# Altium PCB Stepper-Driver-v2.0.PcbDoc (part 5 of 7)
Units mil, origin at the board's own origin, x right, y up, seen from the top; angles counter-clockwise.
Board outline 5905.51 x 4330.71 mil, 4 copper layers (Top Layer, Layer 1, Layer 2, Bottom Layer), stack 62.047 mil thick; 312 components, 285 nets, 1093 pads, 969 vias.
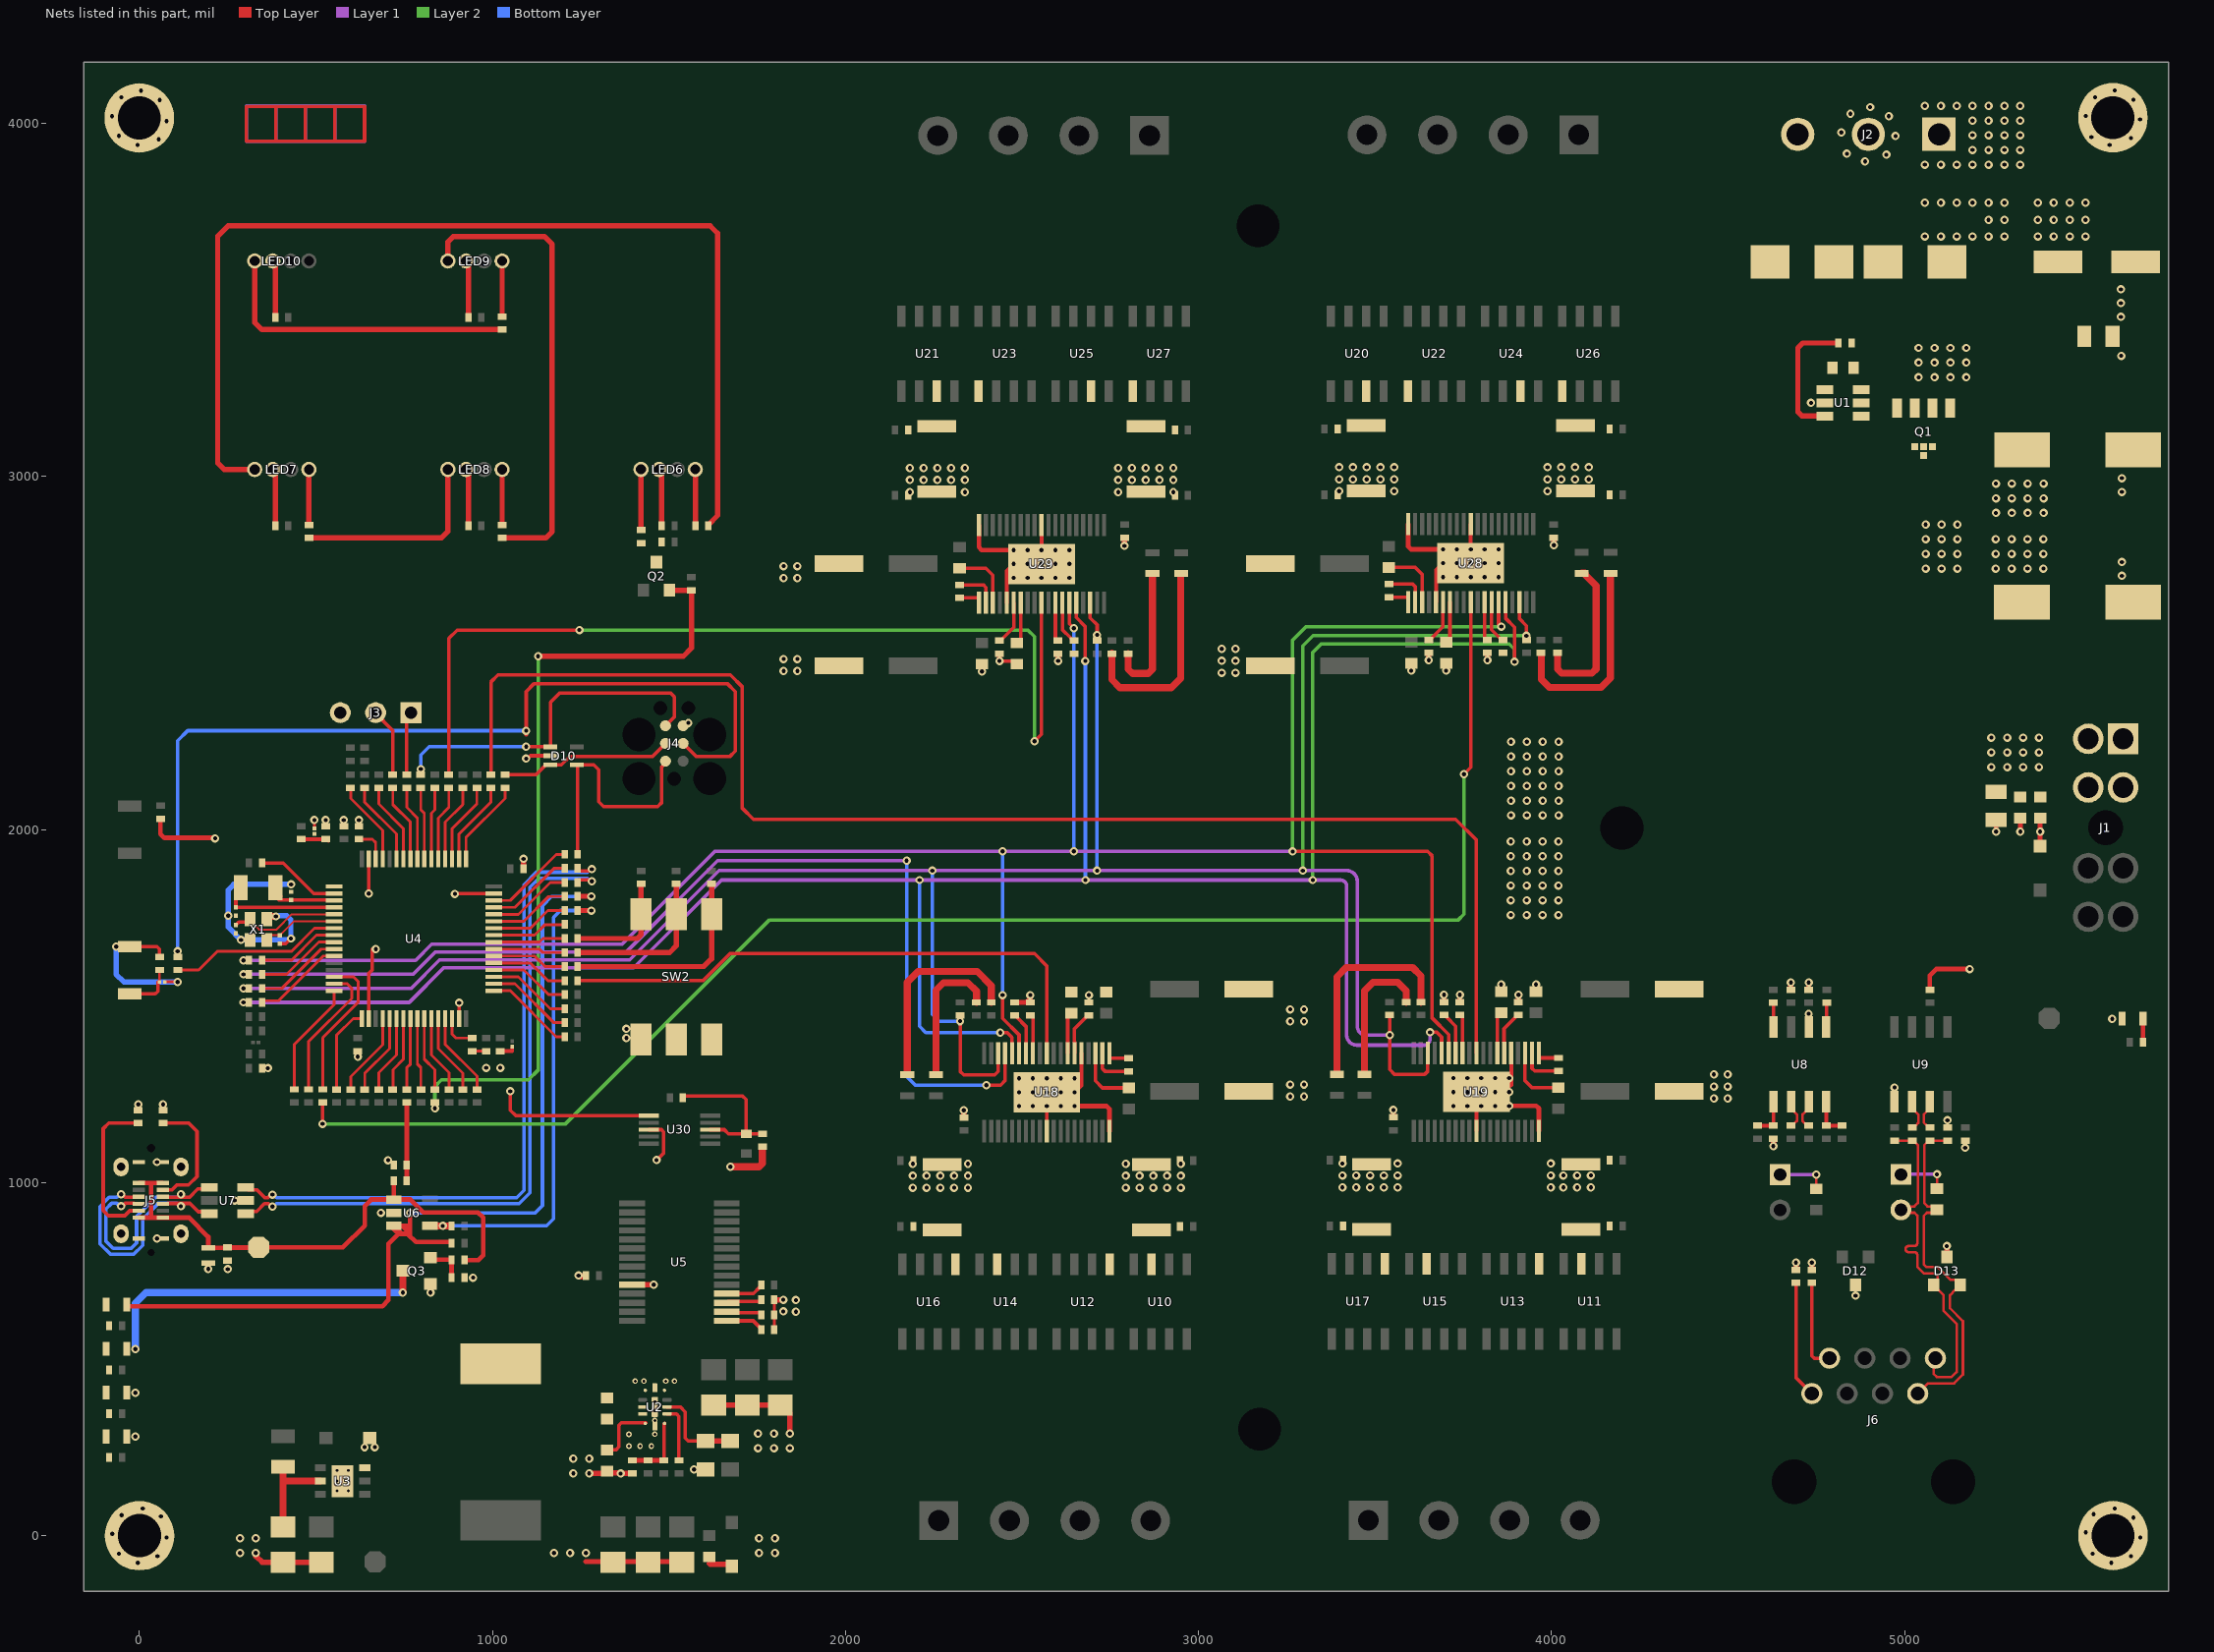
[diagram p5: the nets of this part, all layers, seen from the top]

## Via types
v1: diameter 23.62, hole 11.81, Top Layer to Bottom Layer, tented both sides, 945 vias
v2: diameter 15.75, hole 7.87, Top Layer to Bottom Layer, 24 vias

## Nets (pads, with @x,y where several pads share a name; then routed paths per layer and width w, separated by ;. In a path a pad name is that pad's centre, name@x,y a point inside that pad or via, vN(x,y) a via of type N, cw(c..) or ccw(c..) an arc to the next point about the centre after c; other vN are vias at no path point) (continued)
GND: C1.2 C2.2 C3.2 C4.1 C5.1 C6.1 C7.1 C10.1 C11.1 C12.1 C13.1 C14.1 C15.1 C16.1 C18.1 C19.1 C20.1 C21.2 C22.2 C23.1 C24.1 C25.1 C26.1 C27.1 C28.1 C31.1 C32.1 C33.1 C34.1 C35.1 C36.2 C37.2 C38.1 C39.1 C40.1 C41.1 C42.1 C43.1 C44.1 C45.1 C48.2 C49.2 C50.2 C51.2 C53.1 C55.1 C56.2 C57.1 C58.2 C59.1 C60.2 C61.2 C64.2 C65.2 C66.2 C67.2 C69.1 C71.1 C72.2 C73.1 C74.2 C75.1 C76.2 C77.2 C78.2 D2.1 D3.2 D4.1 D5.1 D6.1 D7.1 D9.1 D10.2 D11.2 D12.3 D13.3 J2.2 J3.3 J4.5 J5.A1 J5.A12 J5.B1 J5.B12 LED1.2 LED2.2 LED3.2 LED6.3 LED7.3 LED8.3 LED9.3 LED10.3 NT3.2 NT4.2 NT7.2 NT8.2 NT11.2 NT12.2 NT15.2 NT16.2 Q3.1 R6.1 R7.1 R12.1 R63.2 R66.2 R67.2 R69.1 R78.1 R79.1 R80.2 R81.2 R87.1 R88.1 R93.1 R97.2 R101.1 R102.1 R103.1 R104.1 R105.1 R106.1 R113.1 R114.1 R115.1 R116.1 R117.1 R118.1 R119.1 R120.1 R127.1 R128.1 R131.2 SW1.2 SW2.4 SW2.5 SW2.6 U1.2 U2.1 U2.6 U2.11 U2.13 U3.6 U3.7 U4.18 U4.31 U4.47 U4.63 U5.10 U6.2 U7.2 U8.2 U9.5 U18.5 U18.29 U18.38 U18.39 U19.5 U19.29 U19.38 U19.39 U28.5 U28.29 U28.38 U28.39 U29.5 U29.29 U29.38 U29.39 U30.1 U30.3 X1.2 X1.4 | length 9322.6
  Top Layer w7: U9.5@4971.25,1228.84 v1(4971.25,1269.46)
  Top Layer w8: SW1.2@-45.71,1668.54 SW1.2@-45.67,1668.5 ; D9.1@73.74,1568.55 v1(108.23,1568.55) ; D7.1@495.25,2005.43 v1(495.22,2027.16) ; C21.2@942.12,1372.66 C25.1@981.93,1372.66 ; C36.2@1264.29,736.72 C36.2@1264.33,736.68 ; R67.2@1797.83,668.18 1797.87,668.13 R67.2@1797.83,668.18 R66.2@1797.83,625.81 R63.2@1797.83,583.45 R63.2@1797.87,583.41 ; C60.2@2334.88,1184.41 C60.2@2334.88,1184.41 ; C71.1@2386.16,2468.6 C71.1@2386.2,2468.64 ; C74.2@2435.79,2498.14 C74.2@2435.84,2498.18 ; R103.1@2523.01,1510.54 R103.1@2523.05,1510.59 ; R118.1@2601.89,2498.14 R118.1@2601.93,2498.19 ; C56.2@2689.06,1510.51 C56.2@2689.1,1510.55 ; C77.2@2789.97,2824.23 C77.2@2790.01,2824.27 ; C61.2@3551.72,1185.27 C61.2@3551.76,1185.31 ; C69.1@3602.14,2470.74 C69.1@3602.19,2470.78 ; C72.2@3651.78,2500.28 C72.2@3651.78,2500.28 ; C73.1@3700.96,2470.78 C73.1@3701.01,2470.82 ; R117.1@3817.87,2500.28 R117.1@3817.87,2500.28 ; C59.1@3856.71,1540.87 C59.1@3856.75,1540.91 ; C58.2@3905.9,1511.36 C58.2@3905.94,1511.41 ; C55.1@3955.53,1540.9 C55.1@3955.57,1540.94 ; C76.2@4005.95,2826.37 C76.2@4006,2826.42 ; R93.1@4627.95,1124.23 R93.1@4627.99,1124.28 ; C38.1@4677.45,1546.23 C38.1@4677.45,1546.23 ; R88.1@4691.95,753.25 R88.1@4691.95,753.25 ; C39.1@4727.95,1546.23 C39.1@4727.95,1546.23 ; R87.1@4736.95,753.25 R87.1@4736.95,753.25 ; D12.3@4860.29,710.7 D12.3@4860.29,710.7
  Top Layer w10: SW1.2@-27.96,1668.5 49.33,1668.5 56.53,1661.3 C31.1@56.53,1639.37 ; C33.1@397.72,1676.94 414.14,1676.94 v1@428.65,1691.44 ; 553.7,3949.16 553.7,4048.62 ; v1(649.19,1819.11) U4.63@649.25,1917.54 ; U4.18@649.25,1464.78 649.25,1592.56 659.19,1602.5 v1@659.19,1661.57 ; v1(893.33,1818.07) 893.85,1818.59 1003.06,1818.59 U4.47@1003.58,1819.11 ; U4.31@905.16,1464.78 v1(905.12,1509.42) ; C23.1@1021.8,1372.66 1055.34,1372.66 D6.1@1055.34,1382.84 ; v1(1050.23,1258.66) 1050.23,1205.18 1065.97,1189.44 U30.1@1442.72,1189.44 ; v1(1095.31,2201.03) 1099,2201.03 1107.03,2209.07 D10.2@1163.93,2209.07 ; U30.3@1442.72,1150.07 1478.69,1150.07 1484.6,1144.16 1484.6,1083.13 1465.53,1064.07 v1(1464.33,1064.07) ; v1(2435.79,2477.52) 2476.1,2477.52 C75.1@2484.98,2468.64 ; 386.38,3949.16 470.04,3949.16 ; 386.38,3949.16 386.38,4048.62 ; 386.38,3949.16 302.71,3949.16 302.71,4048.62 386.38,4048.62 ; 386.38,4048.62 470.04,4048.62 ; 470.04,3949.16 637.36,3949.16 637.36,4048.62 553.7,4048.62 ; 470.04,3949.16 470.04,4048.62 ; 470.04,4048.62 553.7,4048.62
  Top Layer w11: U29.5@2456.48,2642.3 2456.48,2732.85 v1(2476.16,2752.54) ; v1(2554.9,2791.91) U29.29@2554.9,2862.77 ; U18.29@2569.99,1145.91 v1(2569.99,1216.78) ; v1(2648.73,1256.15) 2668.41,1275.83 U18.5@2668.41,1366.39 ; U28.5@3672.46,2644.44 3672.46,2734.99 v1(3692.15,2754.68) ; v1(3770.89,2794.05) U28.29@3770.88,2864.92 ; U19.29@3786.84,1146.77 U19.39@3786.84,1217.63 ; U19.39@3865.57,1257.01 3885.26,1276.69 U19.5@3885.26,1367.24
  Top Layer w13.21: R69.1@59.33,2026.57 59.33,1987.57 70.18,1976.72 212.68,1976.72 v1(214.33,1975.07) ; U29.38@2377.74,2862.77 2377.74,2799.65 2385.48,2791.91 U29.39@2476.16,2791.91 ; v1(2648.73,1216.78) 2739.41,1216.77 2747.15,1209.03 U18.38@2747.15,1145.91 ; U28.38@3593.72,2864.92 3593.72,2801.79 3601.46,2794.05 v1(3692.15,2794.05) ; U19.39@3865.58,1217.63 3956.26,1217.63 3964,1209.89 U19.38@3964,1146.77 ; R97.2@5071.25,1546.23 5071.25,1586.98 5089.33,1605.07 v1(5184.33,1605.07) ; v1(5258.59,1994.07) C5.1@5258.59,2027.15 ; v1(5327.59,1994.07) C6.1@5327.59,2032.14 ; D2.1@5383.59,1953.01 C7.1@5383.59,2032.14
  Top Layer w15: v1(-66.33,1668.54) SW1.2@-45.71,1668.54 ; v1@329.33,-59.16 331.66,-59.16 347.62,-75.12 C20.1@406.17,-75.12 C19.1@515.33,-75.12 ; LED7.3@377.45,3020.63 384.69,3013.39 C42.1@384.69,2860.78 ; LED10.3@377.45,3610.63 384.69,3603.39 C45.1@384.69,3450.78 ; LED8.3@924.58,3020.63 931.81,3013.39 C43.1@931.81,2860.78 ; LED9.3@924.58,3610.63 931.81,3603.39 C44.1@931.81,3450.78 ; C26.1@1087.27,1889.13 1087.38,1889.23 1087.38,1916.9 v1(1087.48,1917) ; v1@1251.17,732.38 1254,735.22 1254,736.72 C36.2@1264.29,736.72 ; 1264.33,-73.29 1533.99,-73.29 C15.1@1535.82,-75.12 ; v1(1273.69,176.34) 1317.69,176.34 C18.1@1324.19,182.84 1329.31,177.72 1361,177.72 v1(1362.65,176.07) 1362.79,176.2 1395.65,176.2 R7.1@1395.78,176.34 ; U5.10@1395.47,711.09 v1(1456.33,711.09) ; LED6.3@1471.74,3020.28 1471.74,3012.62 1478.71,3005.65 C40.1@1478.71,2860.28 ; v1(1570.82,187.84) R6.1@1602.72,187.84 R6.1@1612.72,187.84 ; 1614.33,-78.93 1615.98,-80.58 1671.65,-80.58 D4.1@1677.91,-86.84 ; C12.1@1626.22,370.07 C10.1@1815.33,370.07 1819.48,370.07 1841.98,347.57 v1(1841.98,289.48) ; R67.2@1797.87,668.13 v1@1818.49,668.13 ; C60.2@2334.88,1184.41 v1(2334.92,1205.08) ; v1(2386.16,2447.98) C71.1@2386.16,2468.6 ; v1(2435.79,2477.52) C74.2@2435.79,2498.14 ; R105.1@2478.23,1510.54 2512.73,1510.54 v1@2523.05,1520.86 ; R103.1@2523.05,1510.59 v1@2523.05,1520.86 ; v1(2523.05,1531.21) v1@2523.05,1520.86 ; v1(2601.89,2477.52) R118.1@2601.89,2498.14 ; v1(2789.97,2803.61) C77.2@2789.97,2824.23 ; C61.2@3551.76,1185.31 v1(3551.76,1205.94) ; v1(3602.14,2450.12) C69.1@3602.14,2470.74 ; v1(3651.78,2479.66) C72.2@3651.78,2500.28 ; R106.1@3695.07,1511.4 v1(3695.07,1532.02) ; v1(3700.96,2450.16) C73.1@3700.96,2470.78 ; R104.1@3739.85,1511.4 v1(3739.85,1532.02) ; v1(3817.87,2479.66) R117.1@3817.87,2500.28 ; C59.1@3856.75,1540.91 v1(3856.75,1561.53) ; C58.2@3905.94,1511.41 v1(3905.94,1532.03) ; C55.1@3955.57,1540.94 v1(3955.57,1561.57) ; v1(4005.95,2805.75) C76.2@4005.95,2826.37 ; v1(4627.95,1103.61) R93.1@4627.95,1124.23 ; C38.1@4677.45,1546.23 v1(4677.45,1566.85) ; R88.1@4691.95,753.25 v1(4691.95,773.87) ; C39.1@4727.95,1546.23 v1(4727.95,1566.85) ; R87.1@4736.95,753.25 v1(4736.95,773.87) ; D13.3@5119.33,789.44 5119.33,799.73 v1@5119.33,810.06
  Top Layer w20: X1.4@360.33,1746.49 X1.4@369.91,1756.07 ; X1.4@369.91,1754.07 v1(386.08,1754.07) ; v1(1673.45,1045.07) 1755.33,1045.07 1764.33,1054.07 C78.2@1764.33,1098.73
  Bottom Layer w10: 386.38,4048.62 386.38,3949.16 ; 470.04,3949.16 470.04,4048.62 ; 553.7,3949.16 553.7,4048.62 ; 637.36,4048.62 637.36,3949.16 386.38,3949.16 ; 637.36,4049.41 302.72,4049.41 302.71,3949.16 386.38,3949.16
  Bottom Layer w15: v1(-66.33,1668.54) -66.33,1590.37 -44.51,1568.55 v1(108.23,1568.55) ; v1@386.62,1756.07 417.55,1756.07 428.83,1744.79 v1(428.83,1691.44) 426.5,1691.44 422.48,1687.43 v1(287.35,1687.43) 251.33,1723.46 v1(251.33,1756.07) 251.33,1829.26 266.93,1844.85 429.05,1844.85 v1(429.2,1844.7)
  other v1: 284.33,-49.16 329.33,-49.16 1174.33,-49.16 1219.33,-49.16 1264.33,-49.16 1754.74,-49.16 1799.74,-49.16 284.33,-7.52 329.33,-7.52 1754.74,-7.52 1799.74,-7.52 1228.69,176.34 1228.69,217.98 1273.69,217.98 1751.98,247.84 1796.98,247.84 1841.98,247.84 637.47,250.67 666.47,250.67 -11.68,280.94 1751.98,289.48 1796.98,289.48 -11.68,405.05 1859.33,634.32 1823.49,635.33 1859.33,667.12 1823.49,668.13 4860.53,679.92 824.31,688.88 945.01,730.95 1243.67,736.72 249.7,754.88 194.7,755.61 5119.13,820.26 49.33,841.64 683.66,914.69 269.15,949.44 2190.57,985.5 2229.57,985.5 2268.57,985.5 2307.57,985.5 2346.57,985.5 2793.41,985.5 2832.41,985.5 2871.41,985.5 2910.41,985.5 2949.41,985.5 3407.42,986.36 3446.42,986.36 3485.42,986.36 3524.42,986.36 3563.42,986.36 3997.25,986.36 4033.25,986.36 4072.25,986.36 4111.25,986.36 2190.57,1019.5 2229.57,1019.5 2268.57,1019.5 2307.57,1019.5 2346.57,1019.5 2793.41,1019.5 2832.41,1019.5 2871.41,1019.5 2910.41,1019.5 2949.41,1019.5 3407.42,1020.36 3446.42,1020.36 3485.42,1020.36 3524.42,1020.36 3563.42,1020.36 3997.25,1020.36 4033.25,1020.36 4072.25,1020.36 4111.25,1020.36 2190.57,1053.5 2346.57,1053.5 2793.41,1053.5 2949.41,1053.5 3407.42,1054.36 3563.42,1054.36 3997.25,1054.36 49.33,1058.18 704.01,1063.73 5171.25,1098.61 5121.25,1176.52 2491.25,1216.78 2530.62,1216.78 2609.36,1216.78 3721.84,1217.1 3761.21,1217.1 3800.58,1217.1 3839.95,1217.1 3879.32,1217.1 -3.54,1221.75 66.59,1221.75 4459.37,1238.49 4498.37,1238.49 3259.54,1243.91 3298.54,1243.91 2491.25,1256.15 2530.62,1256.15 2569.99,1256.15 2609.36,1256.15 3721.84,1256.47 3761.21,1256.47 3800.58,1256.47 3839.95,1256.47 3879.32,1256.47 4459.37,1272.49 4498.37,1272.49 3259.54,1277.91 3298.54,1277.91 2491.25,1295.52 2530.62,1295.52 2569.99,1295.52 2609.36,1295.52 2648.73,1295.52 3721.84,1295.84 3761.21,1295.84 3800.58,1295.84 3839.95,1295.84 3879.32,1295.84 4459.37,1306.49 4498.37,1306.49 363.43,1324.08 981.93,1325.16 1021.8,1325.16 618.26,1356.48 1379.08,1409.61 1379.08,1435.71 3259.54,1456.91 3298.54,1456.91 5587.97,1464.22 4727.91,1478.42 3259.54,1490.91 3298.54,1490.91 2689.1,1531.17 669.19,1661.57 3884.33,1758.14 3929.33,1758.14 3974.33,1758.14 4019.33,1758.14 3884.33,1799.78 3929.33,1799.78 3974.33,1799.78 4019.33,1799.78 3884.33,1841.43 3929.33,1841.43 3974.33,1841.43 4019.33,1841.43 3884.33,1883.07 3929.33,1883.07 3974.33,1883.07 4019.33,1883.07 3884.33,1924.71 3929.33,1924.71 3974.33,1924.71 4019.33,1924.71 3884.33,1966.35 3929.33,1966.35 3974.33,1966.35 4019.33,1966.35 5383.59,1994.07 527.21,2027.16 578.48,2027.16 621.47,2027.16 3884.76,2040.45 3929.76,2040.45 3974.76,2040.45 4019.76,2040.45 3884.76,2082.09 3929.76,2082.09 3974.76,2082.09 4019.76,2082.09 3884.76,2123.73 3929.76,2123.73 3974.76,2123.73 4019.76,2123.73 3884.76,2165.37 3929.76,2165.37 3974.76,2165.37 4019.76,2165.37 3884.76,2207.01 3929.76,2207.01 3974.76,2207.01 4019.76,2207.01 3884.76,2248.65 3929.76,2248.65 3974.76,2248.65 4019.76,2248.65 1554.66,2302.25 3065.33,2444.07 3104.33,2444.07 1824.33,2449.07 1863.33,2449.07 3065.33,2478.07 3104.33,2478.07 1824.33,2483.07 1863.33,2483.07 3065.33,2512.07 3104.33,2512.07 1824.33,2712.07 1863.33,2712.07 2476.16,2713.17 2515.53,2713.17 2554.9,2713.17 2594.27,2713.17 2633.64,2713.17 3692.15,2715.31 3731.52,2715.31 3770.89,2715.31 3810.26,2715.31 3849.63,2715.31 5614.94,2718.61 1824.33,2746.07 1863.33,2746.07 2515.53,2752.54 2554.9,2752.54 2594.27,2752.54 2633.64,2752.54 3731.52,2754.68 3770.89,2754.68 3810.26,2754.68 3849.63,2754.68 5614.94,2757.61 2476.16,2791.91 2515.53,2791.91 2594.27,2791.91 2633.64,2791.91 3731.52,2794.05 3810.26,2794.05 3849.63,2794.05 2182.01,2956.18 2338.01,2956.18 2772.32,2956.18 2928.32,2956.18 5615.37,2956.28 3397.99,2958.33 3553.99,2958.33 3988.3,2958.32 2182.01,2990.18 2221.01,2990.18 2260.01,2990.18 2299.01,2990.18 2338.01,2990.18 2772.32,2990.18 2811.32,2990.18 2850.32,2990.18 2889.32,2990.18 2928.32,2990.18 3397.99,2992.33 3436.99,2992.33 3475.99,2992.33 3514.99,2992.33 3553.99,2992.33 3988.3,2992.32 4027.3,2992.32 4066.3,2992.32 4105.3,2992.32 5615.37,2995.28 2182.01,3024.18 2221.01,3024.18 2260.01,3024.18 2299.01,3024.18 2338.01,3024.18 2772.32,3024.18 2811.32,3024.18 2850.32,3024.18 2889.32,3024.18 2928.32,3024.18 3397.99,3026.33 3436.99,3026.33 3475.99,3026.33 3514.99,3026.33 3553.99,3026.33 3988.3,3026.32 4027.3,3026.32 4066.3,3026.32 4105.3,3026.32 4734.62,3208.53 5613.12,3342 5612.05,3452.28 5612.05,3491.28 5612.05,3530.28 4887.73,3892.36 4948.04,3911.35 4836.14,3914.42 4974.13,3964.34 4820.13,3974.34 4955.11,4020.25 4846.22,4027.32 4902.13,4046.34
  other v2: 559.51,127.3 591.41,127.3 559.51,154.86 591.41,154.86 559.51,185.02 591.41,185.02 1386.36,253.84 1418,253.84 1449.9,253.84 1386.04,286.93 1459.73,287.55 1459.74,326.32 1459.9,353.25 1459.74,379.86 1404.11,437.79 1428.81,437.79 1490.68,437.79 1515.37,437.79
GND_A-1: NT1.2 R101.2 U10.3 U12.1
GND_A-2: NT2.2 R102.2 U11.3 U13.1
GND_A-3: NT9.2 R115.2 U20.3 U22.1
GND_A-4: NT10.2 R116.2 U21.3 U23.1
GND_B-1: NT5.2 R113.2 U14.3 U16.1
GND_B-2: NT6.2 R114.2 U15.3 U17.1
GND_B-3: NT13.2 R127.2 U24.3 U26.1
GND_B-4: NT14.2 R128.2 U25.3 U27.1
ID0: R15.1 R55.2 SW2.1 | length 600.4
  Top Layer w15: R55.2@1241.36,1612.03 1598.38,1612.03 1620.48,1634.13 SW2.1@1620.48,1760.16 R15.1@1620.48,1846.29
ID1: R14.1 R56.2 SW2.2 | length 462.6
  Top Layer w15: R56.2@1241.36,1651.79 1501.63,1651.79 1520.48,1670.65 SW2.2@1520.48,1760.16 R14.1@1520.48,1846.3
ID2: R13.1 R57.2 SW2.3 | length 327.4
  Top Layer w15: R57.2@1241.36,1691.56 1409.42,1691.56 1420.48,1702.62 SW2.3@1420.48,1760.16 R13.1@1420.48,1846.29
LED: Q2.2 R17.1 R64.1 | length 2215.3
  Top Layer w15: v1(1128.92,2491.07) 1540.33,2491.07 1563.3,2514.03 1563.3,2677.75 R64.1@1563.1,2677.95 1502.01,2677.95 Q2.2@1501.62,2678.34
  Layer 2 w10: v1(836.52,1210.83) 836.52,1272.6 855.01,1291.09 1101.57,1291.09 1128.92,1318.44 v1(1128.92,2491.07)
LED1_DIN: LED6.4 R68.2 | length 171.5
  Top Layer w15: R68.2@1420.56,2848.74 LED6.4@1420.56,3020.28
LED1_DOUT: LED7.4 R86.2 | length 3031.2
  Top Layer w15: LED7.4@326.27,3020.08 239.32,3020.08 221.33,3038.07 221.33,3680.53 250.67,3709.87 1616.56,3709.87 1637.42,3689.01 1637.42,2889.71 1611.5,2863.79 R86.2@1611.5,2860.29
LED2_DOUT: LED8.4 R98.2 | length 576.8
  Top Layer w15: R98.2@479.81,2826.13 855.01,2826.13 873.51,2844.63 LED8.4@873.51,3020.08
LED3_DOUT: LED9.4 R99.2 | length 1327.5
  Top Layer w15: LED9.4@873.51,3610.63 873.51,3664.67 888.91,3680.07 1146.68,3680.07 1168.6,3658.15 1168.6,2844.29 1150.44,2826.13 R99.2@1027.05,2826.13
LED4_DOUT: LED10.4 R100.2 | length 883.4
  Top Layer w15: LED10.4@326.27,3610.63 326.27,3436.42 346.57,3416.13 R100.2@1027.05,3416.13
LPTIM1_CH1_PC12: R60.2 U29.10 | length 2759.5
  Top Layer w10: R60.2@876.02,2155.31 876.41,2155.69 876.41,2541.62 899.97,2565.18 v1(1245.87,2565.18) ; v1(2535.22,2250.07) 2554.9,2269.75 U29.10@2554.9,2642.3
  Layer 2 w10: v1(1245.87,2565.18) 2516.29,2565.19 2535.22,2546.26 v1(2535.22,2250.07)
NetC3_1: C3.1 C4.2 C8.2 D1.2 J2.1 Q1.1 Q1.2 Q1.3 R1.2 U1.6
  other v1: 5039.33,3281.07 5084.33,3281.07 5129.33,3281.07 5174.33,3281.07 5039.33,3322.71 5084.33,3322.71 5129.33,3322.71 5174.33,3322.71 5039.33,3364.35 5084.33,3364.35 5129.33,3364.35 5174.33,3364.35 5057.33,3680.07 5102.33,3680.07 5147.33,3680.07 5192.33,3680.07 5237.33,3680.07 5282.33,3680.07 5377.33,3680.07 5422.33,3680.07 5467.33,3680.07 5512.33,3680.07 5237.33,3726.71 5282.33,3726.71 5377.33,3726.71 5422.33,3726.71 5467.33,3726.71 5512.33,3726.71 5057.33,3775.35 5102.33,3775.35 5147.33,3775.35 5192.33,3775.35 5237.33,3775.35 5282.33,3775.35 5377.33,3775.35 5422.33,3775.35 5467.33,3775.35 5512.33,3775.35 5057.33,3883.43 5102.33,3883.43 5147.33,3883.43 5192.33,3883.43 5237.33,3883.43 5282.33,3883.43 5327.33,3883.43 5192.33,3925.07 5237.33,3925.07 5282.33,3925.07 5327.33,3925.07 5192.33,3966.71 5237.33,3966.71 5282.33,3966.71 5327.33,3966.71 5192.33,4008.35 5237.33,4008.35 5282.33,4008.35 5327.33,4008.35 5057.33,4049.99 5102.33,4049.99 5147.33,4049.99 5192.33,4049.99 5237.33,4049.99 5282.33,4049.99 5327.33,4049.99
NetC8_1: C8.1 U1.1
NetC9_1: C9.1 L1.1 U2.3 U2.12
NetC9_2: C9.2 U2.4 | length 22.8
  Top Layer w7: C9.2@1324.19,330.18 C9.2@1334.71,340.7 ; U2.4@1417.42,345.18 U2.4@1425.29,345.18
NetC17_1: C17.1 R5.1 R7.2 U2.7 | length 192.6
  Top Layer w10: C17.1@1485.29,213.34 1485.29,316.1 U2.7@1487.06,317.86
  Top Layer w15: R7.2@1397.89,213.34 C17.1@1485.29,213.34
NetC18_2: C18.2 U2.5 | length 177.4
  Top Layer w10: C18.2@1324.19,242.84 1349.04,242.84 1357.65,251.45 1357.65,312.23 1365.09,319.68 U2.5@1434.12,319.68
NetC20_2: C20.2 F1.1 U3.2 | length 275.8
  Top Layer w20: 406.13,154.86 U3.2@512.06,154.86 ; F1.1@406.17,194.82 406.17,132.08 406.2,132.04 C20.2@406.2,24.91
NetC21_1: C21.1 U4.30 | length 105.2
  Top Layer w8: U4.30@885.47,1464.78 885.47,1420.86 896.68,1409.66 C21.1@942.12,1409.66
NetC22_1: C22.1 U4.62 | length 97.3
  Top Layer w8: C22.1@621.47,1972.66 659.94,1972.66 668.94,1963.66 U4.62@668.94,1917.54
NetC46_1: C46.1 U18.2 | length 121.2
  Top Layer w10: U18.2@2727.47,1366.39 2727.47,1322.79 2734.85,1315.42 C46.1@2802,1315.42
NetC46_2: C46.2 U18.1 | length 68.3
  Top Layer w10: U18.1@2747.15,1366.39 2747.15,1353.32 2748.06,1352.42 C46.2@2802,1352.42
NetC47_1: C47.1 U19.2 | length 121.2
  Top Layer w10: U19.2@3944.32,1367.24 3944.32,1323.65 3951.69,1316.28 C47.1@4018.85,1316.28
NetC47_2: C47.2 U19.1 | length 68.3
  Top Layer w10: U19.1@3964,1367.24 3964,1354.18 3964.9,1353.28 C47.2@4018.85,1353.28
NetC52_1: C52.1 U18.3 | length 180.7
  Top Layer w10: U18.3@2707.78,1366.39 2707.78,1288.1 2727.47,1268.41 C52.1@2802.01,1268.41
NetC54_1: C54.1 U19.3 | length 180.7
  Top Layer w10: U19.3@3924.63,1367.24 3924.63,1288.96 3944.31,1269.27 C54.1@4018.85,1269.27
NetC56_1: C56.1 U18.6 | length 122.9
  Top Layer w10: 2648.04,1397.88 2648.04,1435.49 C56.1@2686.1,1473.55 ; U18.6@2648.73,1366.39 2648.73,1397.88
NetC57_2: C57.2 U18.7 | length 114
  Top Layer w10: U18.7@2629.04,1366.39 C57.2@2629.04,1479.18 ; C57.2@2639.04,1479.18 C57.2@2639.91,1480.05
NetC58_1: C58.1 U19.6 | length 122.9
  Top Layer w10: 3864.89,1398.74 3864.89,1436.35 C58.1@3902.94,1474.41 ; U19.6@3865.58,1367.24 3865.58,1398.74
NetC59_2: C59.2 U19.7 | length 114
  Top Layer w10: U19.7@3845.89,1367.24 C59.2@3845.89,1480.04 ; C59.2@3855.89,1480.04 C59.2@3856.75,1480.91
NetC62_1: C62.1 U28.2 | length 121.2
  Top Layer w10: C62.1@3538.87,2695.41 3606.03,2695.41 3613.4,2688.04 U28.2@3613.4,2644.44
NetC62_2: C62.2 U28.1 | length 68.3
  Top Layer w10: C62.2@3538.87,2658.41 3592.82,2658.41 3593.72,2657.51 U28.1@3593.72,2644.44
NetC63_1: C63.1 U29.2 | length 121.2
  Top Layer w10: C63.1@2322.89,2693.27 2390.05,2693.27 2397.42,2685.9 U29.2@2397.42,2642.3
NetC63_2: C63.2 U29.1 | length 68.3
  Top Layer w10: C63.2@2322.89,2656.27 2376.83,2656.27 2377.74,2655.36 U29.1@2377.74,2642.3
NetC68_1: C68.1 U28.3 | length 180.7
  Top Layer w10: C68.1@3538.87,2742.41 3613.41,2742.41 3633.09,2722.73 U28.3@3633.09,2644.44
NetC70_1: C70.1 U29.3 | length 180.7
  Top Layer w10: C70.1@2322.89,2740.27 2397.43,2740.27 2417.11,2720.59 U29.3@2417.11,2642.3
NetC72_1: C72.1 U28.6 | length 92.4
  Top Layer w10: C72.1@3654.78,2537.28 3692.14,2574.65 U28.6@3692.14,2614.17
NetC73_2: C73.2 U28.7 | length 114
  Top Layer w10: C73.2@3700.96,2530.78 C73.2@3701.83,2531.65 ; C73.2@3711.83,2531.65 U28.7@3711.83,2644.44
NetC74_1: C74.1 U29.6 | length 122.9
  Top Layer w10: C74.1@2438.79,2535.14 2476.85,2573.2 2476.85,2610.8 ; 2476.16,2610.8 U29.6@2476.16,2642.3
NetC75_2: C75.2 U29.7 | length 114
  Top Layer w10: C75.2@2484.98,2528.64 C75.2@2485.85,2529.5 ; C75.2@2495.85,2529.5 U29.7@2495.85,2642.3
NetC78_1: C78.1 FB1.1 R129.1 U30.8 | length 443
  Top Layer w10: R129.1@1538.98,1240.07 1538.98,1240.85 1542.98,1244.85 1708.75,1244.85 1718.28,1235.33 1718.28,1145.07 1711.47,1138.25 FB1.1@1711,1138.25 ; U30.8@1615.94,1150.07 1656.21,1150.07 1668.11,1138.17 1710.91,1138.17 FB1.1@1711,1138.25 ; C78.1@1760.83,1138.57 C78.1@1764.33,1138.57 1764.17,1138.41 1711.16,1138.41 FB1.1@1711,1138.25
NetD1_1: D1.1 D3.1
NetJ4_3: J4.3 R37.1 | length 2666
  Top Layer w10: v1@1095.31,2269.07 v1(1095.31,2280.07) 1095.31,2390.99 1117.89,2413.57 1664.83,2413.57 1687.42,2390.97 1687.42,2222.21 1671.78,2206.57 1577.44,2206.57 J4.3@1539.89,2244.11
  Bottom Layer w10: v1(108.23,1655.55) 108.23,2251.65 136.65,2280.07 v1(1095.31,2280.07)
NetJ5_A5: J5.A5 R80.1 | length 450.3
  Top Layer w10: R80.1@-3.67,1168.57 -87.13,1168.57 -102.86,1152.84 -102.86,921.12 -88.34,906.6 -41.56,906.6 -27.78,920.38 J5.A5@-1.65,920.38
NetJ5_B5: J5.B5 R81.1 | length 346
  Top Layer w10: J5.B5@66.46,979.44 92.01,979.44 105.79,993.22 138.89,993.22 162.81,1017.14 162.81,1145.09 139.33,1168.57 R81.1@66.46,1168.57
NetJ6_7: J6.7 R87.2 | length 259.5
  Top Layer w10: R87.2@4736.95,716.25 4736.95,509.55 4743.76,502.74 J6.7@4786.94,502.74
NetJ6_8: J6.8 R88.2 | length 332.2
  Top Layer w10: R88.2@4691.95,716.25 4691.95,447.73 J6.8@4736.95,402.74
NetJ7_1: J7.1 R91.1 | length 142.9
  Top Layer w7: R91.1@4749.33,982.26 v1(4749.33,1022.73)
  Layer 1 w10: J7.1@4646.95,1022.73 v1(4749.33,1022.73)
NetJ8_1: J8.1 R96.1 | length 142.9
  Top Layer w7: R96.1@5091.24,983.07 v1(5091.24,1023.54)
  Layer 1 w10: J8.1@4988.86,1023.54 v1(5091.24,1023.54)
NetLED1_1: LED1.1 R2.2 | length 65.9
  Top Layer w13.21: R2.2@5674.83,1398.3 LED1.1@5674.83,1464.22
NetLED2_1: LED2.1 R8.2
NetLED3_1: LED3.1 R9.2
NetLED4_1: LED4.1 R72.1
NetLED5_1: LED5.1 R74.1
NetLED5_2: LED5.2 Q3.3 | length 961.5
  Top Layer w20: v1(745.7,688.88) Q3.3@745.7,750.47
  Bottom Layer w20: v1(-11.68,528.87) -11.68,659.06 18.15,688.88 v1(745.7,688.88)
NetLED6_1: LED6.1 R86.1 | length 160.2
  Top Layer w15: LED6.1@1574.1,3020.28 1574.3,3020.08 1574.3,2860.48 R86.1@1574.5,2860.29
NetLED7_1: LED7.1 R98.1 | length 156.9
  Top Layer w15: R98.1@479.81,2863.13 LED7.1@479.81,3020.08
NetLED8_1: LED8.1 R99.1 | length 156.9
  Top Layer w15: R99.1@1027.05,2863.13 LED8.1@1027.05,3020.08
NetLED9_1: LED9.1 R100.1 | length 157.5
  Top Layer w15: R100.1@1027.05,3453.13 LED9.1@1027.05,3610.63
NetLED11_2: LED11.2 R109.1 | length 576.7
  Top Layer w20: LED11.2@2174.77,1305.68 2174.77,1567.37 2205.55,1598.15 2372.73,1598.15 2412.66,1558.21 2412.66,1527.19 2412.82,1527.03 2412.82,1512.04 2412.66,1511.88 R109.1@2412.66,1510.54
NetLED12_2: LED12.2 R110.1 | length 609.7
  Top Layer w20: LED12.2@3391.62,1306.34 3391.62,1582.74 3418.6,1609.73 3605.38,1609.73 3629.51,1585.6 R110.1@3629.51,1511.4
NetLED13_2: LED13.2 R111.1 | length 405.3
  Top Layer w20: LED13.2@2255.88,1305.68 2255.88,1545.33 2277.07,1566.53 2346.84,1566.53 2370.88,1542.49 R111.1@2370.88,1510.54
NetLED14_2: LED14.2 R112.1 | length 406.6
  Top Layer w20: LED14.2@3469.72,1306.54 3469.72,1543.19 3493.92,1567.39 3563.69,1567.39 3587.72,1543.35 R112.1@3587.72,1511.4
NetLED15_2: LED15.2 R123.1 | length 458.9
  Top Layer w20: R123.1@4016.43,2500.28 4016.43,2454.73 4028.15,2443.02 4114.35,2443.02 4126.07,2454.73 4126.07,2690.4 4094.34,2722.13 4094.34,2725.85 4094.18,2726.01 LED15.2@4084.65,2726.01
NetLED16_2: LED16.2 R124.1 | length 393.5
  Top Layer w20: R124.1@2800.45,2498.14 2800.45,2454.16 2812.45,2442.16 2857.3,2442.16 2869.01,2453.88 LED16.2@2869.01,2724.99
NetLED17_2: LED17.2 R125.1 | length 586.1
  Top Layer w20: R125.1@3970.86,2500 3970.86,2425.64 3993.68,2402.82 4139.98,2402.82 4166.11,2428.94 LED17.2@4166.11,2725.15
NetLED18_2: LED18.2 R126.1 | length 586.1
  Top Layer w20: R126.1@2754.02,2499.14 2754.02,2424.78 2776.84,2401.96 2923.14,2401.96 2949.26,2428.08 LED18.2@2949.26,2724.29
NetQ1_4: Q1.4 U1.5
NetQ2_3: Q2.3 R65.1 R68.1
NetQ3_2: Q3.2 R76.2 R78.2 | length 126.6
  Top Layer w13.21: Q3.2@815.68,781.63 R76.2@883.84,781.63 ; Q3.2@824.44,787.87 Q3.2@830.68,781.63 ; R78.2@883.83,731.08 R76.2@883.84,780.66
NetR1_1: R1.1 U1.3 | length 383.7
  Top Layer w15: U1.3@4773.64,3171.12 4709.38,3171.12 4697.33,3183.18 4697.33,3364.38 4711.33,3378.38 R1.1@4812.74,3378.38
NetR3_1: R3.1 R6.2 U2.9 | length 272
  Top Layer w10: U2.9@1494.19,364.86 1531.78,364.86 1545.76,350.88 1545.76,276.82 1554.29,268.28 1612.28,268.28 R6.2@1612.72,267.84
  Top Layer w15: R6.2@1612.72,267.84 R3.1@1682.58,267.84
NetR4_2: R4.2 U2.8 | length 161.5
  Top Layer w10: U2.8@1494.19,345.18 1521.01,345.18 1527.92,338.27 R4.2@1527.92,213.34
NetR61_1: R61.1 U5.18 | length 110.1
  Top Layer w10: U5.18@1663.19,685.5 1738.98,685.5 1756.52,703.04 1756.83,703.04 1760.83,707.04 R61.1@1760.83,710.54
NetR63_1: R63.1 U5.15 | length 100.9
  Top Layer w10: U5.15@1663.19,608.73 1738.38,608.73 R63.1@1756.53,590.57
NetR66_1: R66.1 U5.16 | length 102.2
  Top Layer w10: U5.16@1663.19,634.32 1665.88,631.63 1756.83,631.63 1760.83,627.63 R66.1@1760.83,625.81
NetR67_1: R67.1 U5.17 | length 101.7
  Top Layer w10: U5.17@1663.19,659.91 1666.4,663.12 1756.83,663.12 1760.83,667.12 R67.1@1760.83,668.18
NetR82_1: R82.1 R83.2 U8.8 | length 112.6
  Top Layer w10: U8.8@4777.95,1228.84 R82.1@4777.95,1161.23 R83.2@4822.94,1161.23
NetR84_2: R84.2 U8.1 | length 67.5
  Top Layer w10: U8.1@4778.45,1441.94 4778.45,1508.73 R84.2@4778.95,1509.23
NetR85_1: R85.1 U8.7 | length 84
  Top Layer w7: R85.1@4727.95,1161.23 4722.45,1166.73 4718.42,1166.73 4711.06,1174.08 4711.06,1193.25 4727.95,1210.14 U8.7@4727.95,1228.84
NetR89_2: R89.2 U8.4 | length 67.8
  Top Layer w10: U8.4@4627.95,1441.44 R89.2@4627.95,1509.23
NetR90_1: R90.1 U8.6 | length 83.8
  Top Layer w7: R90.1@4677.95,1161.23 4681.45,1161.23 4695.06,1174.84 4695.06,1193.02 4677.95,1210.14 U8.6@4677.95,1228.84
NetR92_2: R92.2 R93.2 U8.5 | length 112.6
  Top Layer w10: R92.2@4582.95,1161.23 R93.2@4627.95,1161.23 U8.5@4627.95,1228.84
NetR94_1: R94.1 U9.7 | length 77.1
  Top Layer w7: R94.1@5062.25,1162.04 5054.36,1169.93 5054.36,1193.25 5071.25,1210.14 U9.7@5071.25,1228.84
NetR95_1: R95.1 U9.6 | length 89.4
  Top Layer w7: R95.1@5021.25,1156.23 5026.75,1161.73 5031.14,1161.73 5038.36,1168.95 5038.36,1193.02 5021.25,1210.14 U9.6@5021.25,1228.84
NetR103_2: R103.2 U18.12 | length 107.2
  Top Layer w10: U18.12@2530.62,1366.39 R103.2@2530.62,1473.54
NetR104_2: R104.2 U19.12 | length 107.2
  Top Layer w10: U19.12@3747.47,1367.24 R104.2@3747.47,1474.4
NetR105_2: R105.2 U18.13 | length 122.8
  Top Layer w10: R105.2@2478.23,1473.54 2481.73,1473.54 2485.73,1469.54 2485.73,1467.74 2510.93,1442.53 U18.13@2510.93,1366.39
NetR106_2: R106.2 U19.13 | length 122.8
  Top Layer w10: R106.2@3695.07,1474.4 3698.57,1474.4 3702.57,1470.4 3702.57,1468.6 3727.78,1443.39 U19.13@3727.78,1367.24
NetR117_2: R117.2 U28.12 | length 107.2
  Top Layer w10: R117.2@3810.25,2537.28 U28.12@3810.25,2644.44
NetR118_2: R118.2 U29.12 | length 107.2
  Top Layer w10: R118.2@2594.27,2535.14 U29.12@2594.27,2642.3
NetR119_2: R119.2 U28.13 | length 123.1
  Top Layer w10: U28.13@3829.57,2644.08 3829.57,2565.95 3854.24,2541.28 3858.65,2541.28 R119.2@3862.65,2537.28
NetR120_2: R120.2 U29.13 | length 122.8
  Top Layer w10: U29.13@2613.96,2642.3 2613.96,2566.15 2639.17,2540.94 2639.17,2539.14 2643.17,2535.14 R120.2@2646.67,2535.14
NRST_MCU: C31.2 D9.2 R37.2 SW1.1 U4.7 | length 645.3
  Top Layer w6: D9.2@51.91,1568.55 D9.2@56.53,1568.55 C31.2@56.53,1602.37
  Top Layer w8: R37.2@102.33,1602.37 167.52,1602.37 219.89,1654.75 429.8,1654.75 495.74,1720.69 U4.7@550.83,1720.69
  Top Layer w10: SW1.1@-27.96,1534.64 44.42,1534.64 51.91,1542.13 D9.2@51.91,1568.55
PA0: R16.1 U4.14 | length 421.1
  Top Layer w8: R16.1@518.81,1264.13 518.81,1410.82 619.28,1511.28 619.28,1569.78 606.16,1582.89 U4.14@550.83,1582.89
PA1: R18.1 U4.15 | length 392.5
  Top Layer w8: R18.1@479.04,1264.13 479.04,1399.86 601.28,1522.09 601.28,1550.09 588.16,1563.21 U4.15@550.83,1563.21
PA2: R20.1 U4.16 | length 325.7
  Top Layer w8: R20.1@438.94,1264.13 438.94,1392.13 550.83,1504.02 U4.16@550.83,1543.52
PA3: R22.1 U4.17 | length 244.6
  Top Layer w8: R22.1@558.3,1264.01 558.3,1417.98 605.1,1464.78 U4.17@629.57,1464.78
PA4: R24.1 U4.20 | length 238.1
  Top Layer w8: R24.1@598.47,1264.01 598.47,1300.71 688.62,1390.86 U4.20@688.62,1464.78
PA5: R26.1 U4.21 | length 229.8
  Top Layer w8: R26.1@638.23,1264.01 638.23,1309.81 708.31,1379.89 U4.21@708.31,1464.78
PA6: R28.1 U4.22 | length 221.5
  Top Layer w8: R28.1@678,1264.01 678,1311.39 727.99,1361.39 U4.22@727.99,1464.78
PA7: R30.1 U4.23 | length 213.2
  Top Layer w8: R30.1@717.76,1264.01 717.76,1319.66 747.68,1349.57 U4.23@747.68,1464.78
PA8: R32.1 U4.41 | length 213.2
  Top Layer w8: U4.41@1003.58,1701 1118.79,1701 1148.71,1730.92 R32.1@1204.36,1730.92
PA9: R34.1 U4.42 | length 221.5
  Top Layer w8: U4.42@1003.58,1720.69 1106.98,1720.69 1156.98,1770.68 R34.1@1204.36,1770.68
PA10: R35.1 U4.43 | length 229.8
  Top Layer w8: U4.43@1003.58,1740.37 1088.48,1740.37 1158.55,1810.45 R35.1@1204.36,1810.45
PA11: R38.1 U4.44 | length 238.1
  Top Layer w8: U4.44@1003.58,1760.06 1073.51,1760.06 1163.66,1850.21 R38.1@1204.36,1850.21
PA12: R39.1 U4.45 | length 246.4
  Top Layer w8: U4.45@1003.58,1779.74 1063.77,1779.74 1174.01,1889.97 R39.1@1204.36,1889.97
PA13: R41.1 U4.46 | length 254.7
  Top Layer w8: U4.46@1003.58,1799.43 1050.2,1799.43 1180.51,1929.74 R41.1@1204.36,1929.74
PA14: R43.1 U4.49 | length 246.4
  Top Layer w8: U4.49@924.84,1917.54 924.84,1977.73 1035.08,2087.96 R43.1@1035.08,2118.31
PA15: R45.1 U4.50 | length 238.1
  Top Layer w8: U4.50@905.16,1917.54 905.16,1987.47 995.31,2077.62 R45.1@995.31,2118.31
PB0: R17.2 U4.26 | length 213.2
  Top Layer w8: U4.26@806.73,1464.78 806.73,1349.57 836.65,1319.66 R17.2@836.65,1264.01
PB1: R19.2 U4.27 | length 221.5
  Top Layer w8: U4.27@826.42,1464.78 826.42,1361.39 876.42,1311.39 R19.2@876.41,1264.01
PB2: R21.2 U4.28 | length 229.8
  Top Layer w8: U4.28@846.1,1464.78 846.1,1379.89 916.18,1309.81 R21.2@916.17,1264.01
PB3: R23.2 U4.55 | length 204.8
  Top Layer w8: R23.2@796.89,2118.31 796.89,2056.36 806.73,2046.52 U4.55@806.73,1917.54
PB4: R25.2 U4.56 | length 213.2
  Top Layer w8: R25.2@757.13,2118.31 757.13,2062.66 787.05,2032.74 U4.56@787.05,1917.54
PB5: R27.2 U4.57 | length 221.5
  Top Layer w8: R27.2@717.37,2118.31 717.37,2070.93 767.36,2020.93 U4.57@767.36,1917.54
PB6: R29.2 U4.58 | length 229.8
  Top Layer w8: R29.2@677.6,2118.31 677.6,2072.51 747.68,2002.43 U4.58@747.68,1917.54
PB7: R31.2 U4.59 | length 238.1
  Top Layer w8: R31.2@637.84,2118.31 637.84,2077.62 727.99,1987.47 U4.59@727.99,1917.54
PB8: R33.2 U4.61 | length 238.3
  Top Layer w8: R33.2@598.08,2118.31 598.08,2087.96 688.62,1997.41 U4.61@688.62,1917.54
PB10: R36.2 U4.29 | length 238.1
  Top Layer w8: U4.29@865.79,1464.78 865.79,1391.55 955.94,1301.4 R36.2@955.94,1264.01
PB12: R40.2 U4.33 | length 254.7
  Top Layer w8: U4.33@1003.58,1543.52 1050.2,1543.52 1180.51,1413.21 R40.2@1204.36,1413.21
PB13: R42.2 U4.34 | length 246.4
  Top Layer w8: U4.34@1003.58,1563.21 1063.77,1563.21 1174.01,1452.97 R42.2@1204.36,1452.97
PB14: R44.2 U4.35 | length 238.1
  Top Layer w8: U4.35@1003.58,1582.89 1073.51,1582.89 1163.66,1492.74 R44.2@1204.36,1492.74
PB15: R46.2 U4.36 | length 229.8
  Top Layer w8: U4.36@1003.58,1602.58 1088.48,1602.58 1158.55,1532.5 R46.2@1204.36,1532.5
PC0: R47.1 U4.8 | length 233
  Top Layer w8: R47.1@347.34,1629.69 430.19,1629.69 501.51,1701 U4.8@550.83,1701
PC1: R48.1 U4.9 | length 241.3
  Top Layer w8: R48.1@347.34,1589.92 416.26,1589.92 507.65,1681.32 U4.9@550.83,1681.32
PC2: R49.1 U4.10 | length 249.7
  Top Layer w8: R49.1@347.34,1550.16 402.84,1550.16 514.31,1661.63 U4.10@550.83,1661.63
PC3: R51.1 U4.11 | length 258
  Top Layer w8: R51.1@347.34,1510.4 352.19,1515.24 393.64,1515.24 520.34,1641.94 U4.11@550.83,1641.95
PC4: R52.1 U4.24 | length 204.8
  Top Layer w8: R52.1@757.52,1264.01 757.52,1325.96 767.36,1335.8 U4.24@767.36,1464.78
PC5: R53.1 U4.25 | length 204.8
  Top Layer w8: U4.25@787.05,1464.78 787.05,1335.8 796.89,1325.96 R53.1@796.88,1264.01
PC6: R54.1 U4.37 | length 221.5
  Top Layer w8: U4.37@1003.58,1622.26 1106.98,1622.26 1156.98,1572.26 R54.1@1204.36,1572.26
PC7: R55.1 U4.38 | length 213.2
  Top Layer w8: U4.38@1003.58,1641.95 1118.79,1641.95 1148.71,1612.03 R55.1@1204.36,1612.03
PC8: R56.1 U4.39 | length 204.8
  Top Layer w8: U4.39@1003.58,1661.63 1132.57,1661.63 1142.41,1651.79 R56.1@1204.36,1651.79
PC9: R57.1 U4.40 | length 204.8
  Top Layer w8: U4.40@1003.58,1681.32 1132.57,1681.32 1142.41,1691.16 R57.1@1204.36,1691.16
PC10: R58.1 U4.51 | length 229.8
  Top Layer w8: U4.51@885.47,1917.54 885.47,2002.43 955.55,2072.51 R58.1@955.55,2118.31
PC11: R59.1 U4.52 | length 221.5
  Top Layer w8: U4.52@865.79,1917.54 865.79,2020.93 915.79,2070.93 R59.1@915.79,2118.31
PC12: R60.1 U4.53 | length 213.2
  Top Layer w8: U4.53@846.1,1917.54 846.1,2032.74 876.02,2062.66 R60.1@876.02,2118.31
PC13: R62.1 U4.2 | length 239.2
  Top Layer w10: R62.1@347.34,1905.3 407.1,1905.3 493.28,1819.11 U4.2@550.83,1819.11
PC14-OSC32_IN: C34.2 U4.3 X2.2 | length 295.9
  Top Layer w10: X2.2@385.04,1819.36 386.08,1818.32 386.08,1809.51 X2.2@394.22,1801.37 ; X2.2@385.04,1832.54 385.04,1863.83 399.62,1810.36 389.58,1820.41 388.17,1820.41 388.17,1831.98 X2.2@385.04,1835.11 ; X2.2@394.22,1800.37 401.72,1800.37 C34.2@429.2,1800.37 ; C34.2@430.36,1800.21 550.05,1800.21 U4.3@550.83,1799.43
PC15-OSC32_OUT: C35.2 U4.4 X2.1 | length 338.3
  Top Layer w10: C35.2@272.84,1779.87 272.84,1821.34 X2.1@286.61,1835.11 ; C35.2@273.45,1779.74 U4.4@550.83,1779.74
PD2: R50.2 U4.54 | length 204.8
  Top Layer w8: U4.54@826.42,1917.54 826.42,2046.52 836.26,2056.36 R50.2@836.26,2118.31
PH0-OSC_IN: C32.2 U4.5 X1.1 | length 313.4
  Top Layer w5.5: X1.1@313.09,1742.55 338.68,1716.96 388.31,1716.96 431.41,1760.06 U4.5@550.83,1760.06
  Top Layer w10: C32.2@272.84,1729.77 281.39,1738.32 304.93,1738.32 X1.1@313.09,1746.49
PH1-OSC_OUT: C33.2 U4.6 X1.3 | length 212.6
  Top Layer w5.5: X1.3@360.34,1687.43 360.34,1687.81 373.09,1700.56 C33.2@397.72,1700.56 437.53,1740.37 U4.6@550.83,1740.37
RS485_N: D13.2 J6.2 R94.2 R96.2 R131.1 | length 1021.3
  Top Layer w7: J6.2@5036.95,402.74 5065.75,431.54 5140.09,431.54 5164.94,456.38 5164.94,607.56 5128.33,644.17 5128.33,681.21 5143.2,696.09 5144.09,696.09 5156.73,708.73 5156.73,712.66 5144.09,725.31 5129.17,725.31 5093.65,760.83 5062.08,760.83 5053.75,769.15 5053.75,905.85 5062.74,914.84 5083.01,914.84 R96.2@5091.24,923.07 5081.46,932.84 5064.56,932.84 5055.25,942.16 5055.25,1106.15 5062.25,1113.15 5062.25,1113.73 5067.75,1119.23 R94.2@5071.25,1119.23 R131.1@5121.25,1119.23
RS485_P: D13.1 J6.1 J8.2 R95.2 R130.1 | length 1025.6
  Top Layer w7: R130.1@4971.25,1119.23 R95.2@5021.25,1119.23 5024.75,1119.23 5030.25,1113.73 5030.25,1113.47 5037.25,1106.47 5037.25,942.51 5027.58,932.84 4999.11,932.84 J8.2@4989.33,923.07 ; J8.2@4998.86,923.54 5007.55,914.84 5027.76,914.84 5035.75,906.85 5035.75,849.32 5035.75,828.82 cw(c5027.25,828.82) 5027.25,820.32 5011.05,820.32 ccw(c5011.05,811.82) 5011.05,803.32 5027.25,803.32 cw(c5027.25,794.82) 5035.75,794.82 5035.75,773.8 5035.75,761.7 5054.63,742.83 5086.2,742.83 5093.82,735.21 5093.82,724.55 5081.93,712.66 5081.93,708.73 5094.57,696.09 5094.93,696.09 5110.33,680.69 5110.33,636.71 5146.94,600.11 5146.94,463.84 5132.63,449.54 5090.57,449.54 5082.11,457.99 5082.11,497.9 J6.1@5086.95,502.74
SHGND: J2.3 J5.S1 J5.S2 J5.S3 J5.S4 pad.MH1@0,0 pad.MH1@5589.82,4016.48 pad.MH1@5590.18,0.37 pad.MH1@-0.74,4015.75
  other v1: -5.16,-77 5585.18,-76.8 50.75,-57.98 5641.1,-57.78 -58.15,-50.91 5532.2,-50.71 76.84,-5 5667.18,-4.8 -77.16,5 5513.21,9.61 5648.17,51.12 60.82,54.91 -51.08,57.98 5535.27,61.19 9.24,76.97 5595.18,77.2 -5.74,3938.91 5580.58,3939.51 54.18,3954.93 5640.89,3958.5 5529,3961.57 -58.72,3965 76.24,4006.51 5666.98,4011.48 -77.74,4020.91 5512.98,4021.48 57.25,4066.82 5647.96,4067.4 -51.65,4073.89 5539.07,4074.47 4.26,4092.91 5594.98,4093.48
SPI1_MISO: R49.2 R107.2 R108.2 R121.2 R122.2 U18.17 U19.17 U28.17 U29.17 | length 7127.5
  Top Layer w10: R107.2@2324.45,1473.54 2324.45,1315.26 2334.5,1305.21 2422.49,1305.21 2432.19,1314.91 U18.17@2432.19,1366.39 ; U29.17@2692.7,2644.46 U29.17@2692.7,2642.3 2692.7,2599.47 2712.51,2579.66 v1(2712.51,2551.33) ; R122.2@2704.88,2539.14 2708.88,2535.14 R122.2@2712.38,2535.14 ; R108.2@3541.16,1474.27 3541.16,1320.14 3555.23,1306.07 3639.33,1306.07 3649.04,1315.77 U19.17@3649.04,1367.24 ; U28.17@3908.68,2642.22 3908.68,2597.23 3928.49,2577.42 v1(3928.49,2549.09)
  Layer 1 w10: v1(294.16,1550.29) 769.88,1550.29 850.1,1630.5 1388.7,1630.5 1642.03,1883.83 v1(2245.58,1883.83) v1(2712.38,1883.83) v1(3295.4,1883.83) 3419.33,1883.83 cw(c3419.33,1853.83) 3449.33,1853.83 3449.33,1442.55 ccw(c3473.66,1442.55) 3473.66,1418.22 v1(3541.16,1418.22)
  Layer 2 w10: v1(3295.4,1883.83) 3295.4,2520.34 3324.15,2549.09 v1(3928.49,2549.09)
  Bottom Layer w10: v1@2245.33,1883.83 2245.33,1477.07 2265.03,1457.36 v1(2324.32,1457.36) ; v1(2712.38,1883.83) v1@2712.38,2547.64
SPI1_MOSI: R51.2 U18.15 U19.15 U28.15 U29.15 | length 7038.8
  Top Layer w10: v1(2438.4,1424.93) 2458.01,1424.93 2471.49,1411.45 U18.15@2471.49,1366.46 ; U29.15@2653.41,2642.22 2653.41,2600.86 2678.92,2575.35 v1(2678.92,2477.52) ; v1(3655.24,1425.78) 3674.86,1425.78 3688.33,1412.31 U19.15@3688.33,1367.32 ; U28.15@3869.39,2639.99 3869.39,2598.62 3894.9,2573.11 v1(3894.9,2475.28)
  Layer 1 w10: v1(294.16,1510.52) 763.93,1510.52 861.65,1608.25 1399.76,1608.25 1635.58,1844.07 1648.58,1857.07 v1(2209.22,1857.07) v1(2679.33,1857.07) v1(3323.4,1857.07) 3401.88,1857.07 cw(c3401.88,1839.62) 3419.33,1839.62 3419.33,1418.22 ccw(c3448.24,1418.22) 3448.24,1389.31 3637.69,1389.31 ccw(c3637.69,1406.87) 3655.24,1406.87 v1(3655.24,1425.78)
  Layer 2 w10: v1(3323.4,1857.07) 3323.4,2502.14 3347.33,2526.07 3879.23,2526.07 3894.9,2510.4 v1(3894.9,2475.28)
  Bottom Layer w10: v1(2209.22,1857.07) 2209.22,1442.82 2227.12,1424.93 v1(2438.4,1424.93) ; v1(2678.92,2477.52) 2679.12,2477.31 2679.12,1857.27 v1(2679.33,1857.07)
SPI1_NSS: R48.2 U18.16 | length 2995.7
  Top Layer w10: v1(2398.73,1275.83) 2438.74,1275.83 2451.88,1288.98 U18.16@2451.88,1366.39
  Layer 1 w10: v1(294.16,1590.05) 774.79,1590.05 837.43,1652.69 1377.76,1652.69 1637.08,1912.01 v1(2172.88,1912.01)
  Bottom Layer w10: v1(2172.88,1912.01) 2172.88,1300.52 2197.56,1275.83 v1(2398.73,1275.83)
SPI1_SCK: R47.2 U18.14 U19.14 U28.14 U29.14 | length 6678.5
  Top Layer w10: v1(2444.75,1531.21) 2444.75,1465.06 2491.25,1418.56 U18.14@2491.25,1366.39 ; U29.14@2633.64,2642.3 2633.64,2583.09 v1(2646.67,2570.07) ; v1@3267.33,1938.07 3648.59,1938.07 3661.59,1925.07 3661.59,1465.92 3708.1,1419.42 U19.14@3708.1,1367.24 ; 3849.62,2593.01 3849.62,2586.42 ; U28.14@3849.62,2642.22 3849.62,2586.42 ; v1@3857.43,2578.61 v1(3857.43,2574.92) ; 3849.62,2586.31 3849.62,2582.73 ccw(c3857.43,2582.73) v1(3857.43,2574.92) ; 3849.62,2586.31 3849.62,2586.42 ; 3849.62,2586.31 3857.43,2578.51 v1(3857.43,2574.92)
  Layer 1 w10: v1@295.04,1629.82 782,1629.82 827.57,1675.39 1366.73,1675.39 1629.82,1938.48 v1(2444.55,1938.48) v1(2646.67,1938.48) v1@3265.99,1938.48
  Layer 2 w10: v1(3266.37,1938.1) 3266.37,2537.11 3304.19,2574.92 v1(3857.43,2574.92)
  Bottom Layer w10: v1@2444.55,1531.21 v1(2444.55,1938.48) ; v1(2646.67,1938.48) v1(2646.67,2570.07)
  other v1: 294.16,1629.82
STEP-1: R54.2 U18.10 | length 1622.1
  Top Layer w10: R54.2@1241.36,1572.26 1596.53,1572.26 1673.06,1648.79 2534.78,1648.79 2569.99,1613.58 U18.10@2569.99,1366.39
STEP-2: R45.2 U19.10 | length 4060.6
  Top Layer w10: R45.2@995.31,2155.31 995.31,2417.73 1015.34,2437.76 1674.05,2437.76 1707.58,2404.23 1707.58,2060.18 1738.7,2029.07 3728.26,2029.07 3786.84,1970.49 U19.10@3786.84,1367.24
STEP-3: R16.2 U28.10 | length 4431.7
  Top Layer w10: v1(518.68,1166.57) 518.74,1166.63 518.74,1227.07 R16.2@518.81,1227.13 ; v1(3751.83,2157.07) 3770.88,2176.12 U28.10@3770.88,2644.44
  Layer 2 w10: v1(518.68,1166.57) 1206.93,1166.57 1784.54,1744.18 3735.6,1744.18 3751.83,1760.42 v1(3751.83,2157.07)
SWCLK: D10.3 J4.4 R43.2 | length 491.6
  Top Layer w10: R43.2@1035.08,2155.31 1035.16,2155.39 1123.05,2155.39 1151.13,2183.48 D10.3@1163.93,2183.48 1195.19,2183.48 1219.07,2207.36 1453.14,2207.36 J4.4@1489.89,2244.11
SWDIO: D10.4 J4.2 R41.2 | length 724.4
  Top Layer w10: R41.2@1241.36,1930.14 1241.36,2181.59 1239.47,2183.48 D10.4@1238.73,2183.48 1287.15,2183.48 1300.88,2169.75 1300.88,2078.65 1314.46,2065.07 1467.62,2065.07 1479.32,2076.76 1479.32,2177.86 1489.89,2188.43 J4.2@1489.89,2194.11
SWO: D10.1 J4.6 R23.1 | length 1001.4
  Top Layer w10: v1(1095.31,2234.66) D10.1@1163.93,2234.66 1163.93,2360.75 1190.34,2387.17 1503.75,2387.17 1514.89,2376.02 1514.89,2319.11 J4.6@1489.89,2294.11
  Bottom Layer w10: v1(796.62,2171.49) 796.62,2210.86 820.42,2234.66 v1(1095.31,2234.66)
USART2_RX: J3.2 R27.1 | length 197.3
  Top Layer w10: J3.2@668.76,2331.16 667.86,2330.26 717.86,2280.26 717.86,2156.21 R27.1@716.96,2155.31
USART2_TX: J3.1 R25.1 | length 175.8
  Top Layer w10: R25.1@756.73,2155.31 J3.1@756.73,2331.16
USB_FS_N: R38.2 U7.1 | length 1937.9
  Top Layer w10: U7.1@300.9,911.91 307.53,918.54 331.71,918.54 353.75,940.58 364.57,940.58 372.64,932.5 v1(376.33,932.5) ; R38.2@1241.36,1850.61 1241.36,1853.68 1245.36,1857.68 1273.65,1857.68 1277.64,1853.68 v1(1281.33,1853.68)
  Bottom Layer w10: v1(376.33,932.5) 380.02,932.5 388.05,940.54 1075.46,940.54 1106.07,971.16 1106.07,1837.03 1131.32,1862.28 1269.05,1862.28 1277.64,1853.68 v1(1281.33,1853.68)
USB_FS_OVCR: LED4.2 R35.2 R73.1 U6.3 | length 2748.1
  Top Layer w13.21: LED4.2@-35.86,654.62 -35.86,652.98 -32.63,649.74 687.75,649.74 705.24,667.23 705.24,827.14 732.91,854.82 743.89,854.82 ; U6.3@720.15,877.29 735.2,877.29 744.55,877.29 ; 735.58,854.82 709.02,877.77 712.33,877.77 716.63,882.07 739.74,858.97 ; 745.72,854.82 761.29,854.82 761.29,853.24 782.67,831.86 881.44,831.86 883.83,829.46 R73.1@883.83,828.68 ; 764.16,857.68 744.55,877.29 ; 766.15,852.88 766.15,870.99 ; v1(766.15,914.69) 766.15,877.29 766.15,870.99 ; R35.2@1241.36,1810.85 v1(1279.79,1810.85) ; 744.55,877.29 759.85,877.29 766.15,870.99
  Bottom Layer w10: v1(766.15,914.69) 1120.94,914.69 1141.33,935.08 1141.33,1784.87 1167.31,1810.85 v1(1279.79,1810.85)
USB_FS_P: R39.2 U7.3 | length 1938.5
  Top Layer w10: U7.3@300.9,986.72 307.61,980.01 331.63,980.01 353.82,957.82 364.33,957.82 372.64,966.13 v1(376.33,966.13) ; R39.2@1241.36,1890.37 1241.36,1887.35 1245.36,1883.35 1273.11,1883.35 1277.64,1887.88 v1(1281.33,1887.88)
  Bottom Layer w10: v1(376.33,966.13) 380.02,966.13 388.6,957.54 1068.42,957.54 1089.07,978.2 1089.07,1844.07 1124.28,1879.28 1269.05,1879.28 1277.64,1887.88 v1(1281.33,1887.88)
USB_FS_PWR_EN: R34.2 R75.1 U6.4 | length 1388.7
  Top Layer w13.21: R34.2@1241.36,1771.08 1241.56,1770.88 1279.59,1770.88 v1(1279.79,1770.68)
  Top Layer w20: U6.4@822.51,877.29 v1(858.79,877.29) R75.1@881.41,877.29
  Bottom Layer w10: v1@858.79,877.67 1152.89,877.67 1172.33,897.11 1172.33,1751.16 1191.86,1770.68 v1(1279.79,1770.68)
USB_N: J5.A7 J5.B7 U7.6 | length 749
  Top Layer w10: v1(-52.25,966.72) -48.56,966.72 -40.25,958.41 -16.03,958.41 -15.59,958.85 -2.78,958.85 J5.A7@-1.77,959.86 ; J5.B7@66.46,940.07 67.36,940.97 80.39,940.97 80.6,941.18 128.81,941.18 ; 105.28,941.18 v1@113.36,933.1 ; v1(117.05,933.1) 120.73,933.1 128.81,941.18 ; U7.6@193.6,912.51 188.56,917.55 165.96,917.55 142.34,941.18 128.81,941.18
  Bottom Layer w10: v1(-52.25,966.72) -55.93,966.72 -64.24,958.41 -86.1,958.41 -111.98,932.53 -111.98,826.82 -82,796.85 -16.56,796.85 8.74,822.14 8.74,897.33 52.82,941.41 105.05,941.41 113.36,933.1 v1(117.05,933.1)
USB_P: J5.A6 J5.B6 U7.4 | length 688.9
  Top Layer w10: v1(-52.25,933.1) -48.56,933.1 -40.25,941.41 -16.03,941.41 -15.59,940.97 -2.56,940.97 J5.A6@-1.65,940.07 ; J5.B6@66.79,959.42 67.36,958.85 80.39,958.85 81.06,958.18 141.22,958.18 165.04,982 188.29,982 U7.4@193.6,987.31 ; 105.28,958.64 v1@113.36,966.72 ; v1@120.73,966.72 128.81,958.64
  Bottom Layer w10: v1(-52.25,933.1) -55.93,933.1 -64.24,941.41 -79.06,941.41 -94.98,925.49 -94.98,833.86 -74.96,813.85 -23.6,813.85 -8.26,829.19 -8.26,904.38 45.78,958.41 105.05,958.41 113.36,966.72 v1(117.05,966.72)
VBAT: C28.2 D7.2 R10.2 U4.1 | length 81.3
  Top Layer w10: R10.2@458.24,1972.66 495.22,1972.66 ; 495.28,1972.71 495.22,1972.66 ; C28.2@534.71,1968.54 534.71,1968.66 530.71,1972.66 495.22,1972.66 ; U4.1@548.26,1839.7 549.92,1839.7 U4.1@550.83,1838.8
VBUS_DET: R52.2 R77.1 R79.2 | length 222.2
  Top Layer w13.21: R77.1@757.04,1004.84 757.08,1004.88 757.08,1226.98 R52.2@757.12,1227.01
VBUSc: C37.1 D11.1 J5.A4 J5.A9 J5.B4 J5.B9 R76.1 R77.2 TP3.1 U6.1 | length 1509.7
  Top Layer w13.21: J5.A4@-1.65,900.7 32.4,900.7 ; J5.A9@-1.65,999.12 32.4,999.12 ; J5.B4@66.46,999.12 32.4,999.12 ; C37.1@248.99,815.23 D11.1@194.83,815.23 194.83,846.49 140.63,900.7 J5.B9@66.46,900.7 32.4,900.7 ; C37.1@249.83,816.07 336.56,816.07 TP3.1@337.4,816.91 576.17,816.91 637.82,878.56 637.82,934.22 655.7,952.09 U6.1@720.15,952.09 ; 720.15,992.08 U6.1@720.15,952.09 ; R76.1@920.84,780.66 960.06,780.66 973.33,793.93 973.33,901.28 958.74,915.87 804.04,915.87 771.68,948.22 767.81,952.09 U6.1@720.15,952.09 ; 32.4,900.7 32.4,999.12
VIN: C1.1 C2.1 C5.2 C6.2 C7.2 J1.1 J1.2 J1.7 J1.8 Q1.5 Q1.6 Q1.7 Q1.8 U1.4
  other v1: 5245.33,2177.07 5290.33,2177.07 5335.33,2177.07 5380.33,2177.07 5245.33,2218.71 5290.33,2218.71 5335.33,2218.71 5380.33,2218.71 5245.33,2260.35 5290.33,2260.35 5335.33,2260.35 5380.33,2260.35 5059.33,2739.4 5104.33,2739.4 5149.33,2739.4 5257.9,2739.4 5302.9,2739.4 5347.9,2739.4 5392.9,2739.4 5059.33,2781.04 5104.33,2781.04 5149.33,2781.04 5257.9,2781.04 5302.9,2781.04 5347.9,2781.04 5392.9,2781.04 5059.33,2822.68 5104.33,2822.68 5149.33,2822.68 5257.9,2822.68 5302.9,2822.68 5347.9,2822.68 5392.9,2822.68 5059.33,2864.32 5104.33,2864.32 5149.33,2864.32 5258.33,2896.78 5303.33,2896.78 5348.33,2896.78 5393.33,2896.78 5258.33,2938.43 5303.33,2938.43 5348.33,2938.43 5393.33,2938.43 5258.33,2980.07 5303.33,2980.07 5348.33,2980.07 5393.33,2980.07
pads on no net: D10.5 J1. J4.MP1 J4.MP2 J4.MP3 J4.MP4 J4.MP5 J4.MP6 J4.MP7 J5.A8 J5.B8 J5.MH J6. J6.3 J6.6 LED10.1 U3.1 U3.4 U3.5 U5.3 U5.4 U5.5 U5.6 U5.7 U5.8 U5.11 U5.14 U5.19 U5.20 U7.5

## Polygon pours and split planes (outlines as drawn)
24V on Top Layer "24V_L01_P124" (solid, pour order 124): 5728.95,1936.85 5728.95,1279.68 5699.33,1250.07 5360.39,1250.07 5327.59,1282.87 5327.59,1936.85
24V on Top Layer "24V_L01_P106" (solid, pour order 106): 1533.76,534.16 1549.66,550.07 1837.33,550.07 2210.88,550.07 2210.88,439.21 1574.33,439.21 1574.33,379.3 1481.4,379.3 1481.4,391.92 1533.76,391.92
VBUSc on Top Layer "VBUSC_L01_P129" (solid, pour order 129): 664.33,670.07 678.02,683.76 678.02,888.94 689.29,900.21 937.69,900.21 945.01,892.88 945.01,828.55 919.2,828.55 902.33,811.68 902.33,763 1006.26,763 1006.26,920.07 994.15,934.25 830.51,934.25 782.41,982.34 738.04,982.34 738.04,1017.34 608.79,1017.34 596.33,1004.88 596.62,941.26 561.96,906.6 -104.76,906.6 -104.76,670.07
3V3 on Top Layer "3V3_L01_P115" (solid, pour order 115): 832.33,238.16 849.33,255.16 849.33,606.87 833.13,623.07 -47.67,623.07 -58.21,612.53 -58.21,561.65 2.75,561.65 10.15,554.24 10.15,502.89 3.04,495.78 -58.21,495.78 -58.21,437.83 2.56,437.83 10.15,430.24 10.15,379.89 2.22,371.96 -58.21,371.96 -58.21,313.71 3.09,313.71 11.2,305.6 11.2,238.16 605.56,238.16 605.56,314.72 699.33,314.72 699.33,238.16
VBAT on Top Layer "VBAT_L01_P127" (solid, pour order 127): 574.45,1873.52 555.6,1873.52 545.59,1883.53 545.59,1987.98 445.74,1987.98 445.74,1888.46 498.86,1835.33 574.45,1835.33
AVDD on Top Layer "AVDD_L01_P126" (solid, pour order 126): 334.39,1482.72 381.67,1482.72 515.31,1616.36 574.45,1616.36 574.45,1550.12 376.16,1351.84 334.39,1351.84
24V on Top Layer "24V_L01_P104" (solid, pour order 104): 1438.09,391.92 1385.73,391.92 1385.73,446.9 1359.05,446.9 1359.05,378.31 1438.09,378.31
BOUT2-4 on Top Layer "NONET_L-01_P-001" (solid, remove dead copper, pour order 92): 3040.86,3394.13 3051.39,3383.6 3051.39,2935.75 3015.12,2899.48 2716.22,2899.48 2716.22,2862.77 2708.62,2862.77 2708.62,2913.29 3001.42,2913.29 3029.39,2941.25 3029.39,3205.21 2986.02,3205.21 2986.02,3282.12 2942,3282.12 2942,3205.21 2886.17,3205.21 2886.17,3293.44 2788.69,3293.44 2788.69,3802.15 2768.35,3822.49 2768.35,4143.34 3050.52,4143.34 3050.52,3589.84 2878.89,3589.84 2878.89,3394.13
BOUT2-3 on Top Layer "NONET_L-01_P-001" (solid, remove dead copper, pour order 97): 4202,3207.35 4202,3282.13 4157.99,3282.13 4157.99,3207.35 4102.16,3207.35 4102.16,3292.52 4004.67,3292.52 4004.67,3804.29 3984.33,3824.63 3984.33,4145.49 4267.37,4145.49 4267.37,3587.62 4094.87,3587.62 4094.87,3400.48 4267.37,3400.48 4267.37,2929.73 4239.27,2901.62 3932.21,2901.62 3932.21,2864.92 3924.6,2864.92 3924.6,2915.24 4225.5,2915.24 4245.37,2935.11 4245.37,3207.35
BOUT1-3 on Top Layer "NONET_L-01_P-001" (solid, remove dead copper, pour order 96): 3839.52,3123.09 3794.34,3077.91 3794.34,2864.92 3781.09,2864.92 3781.09,3400.48 3893.55,3400.48 3893.55,3592.01 3789.55,3592.01 3789.55,4145.49 3964.88,4145.49 3964.88,3811.71 3984.33,3792.26 3984.33,3292.52 3839.52,3292.52
GND_A-1 on Top Layer "GND_A-1_L01_P043" (solid, pour order 43): 2969.25,828.92 2969.25,929.85 2720.59,929.85 2720.59,738.7 2794.98,738.7 2794.98,807.97 2838.8,807.97 2838.8,738.7 2895,738.7 2895,828.92
GND_B-1 on Top Layer "GND_B-1_L01_P044" (solid, pour order 44): 2173.58,829.07 2173.58,929.85 2457.17,929.85 2457.17,738.7 2401.42,738.7 2401.42,807.97 2357.63,807.97 2357.63,738.7 2282.76,738.7 2282.76,829.07